# Altium PCB DC-Motor-Driver-v1.0.PcbDoc (part 3 of 5)
Units mil, origin at the board's own origin, x right, y up, seen from the top; angles counter-clockwise.
Board outline 1968.5 x 1574.8 mil, 4 copper layers (Top Layer, Signal 1, Signal 2, Bottom Layer), stack 62.055 mil thick; 133 components, 124 nets, 619 pads, 342 vias.
Unrouted connection lines stored in the file: 5.
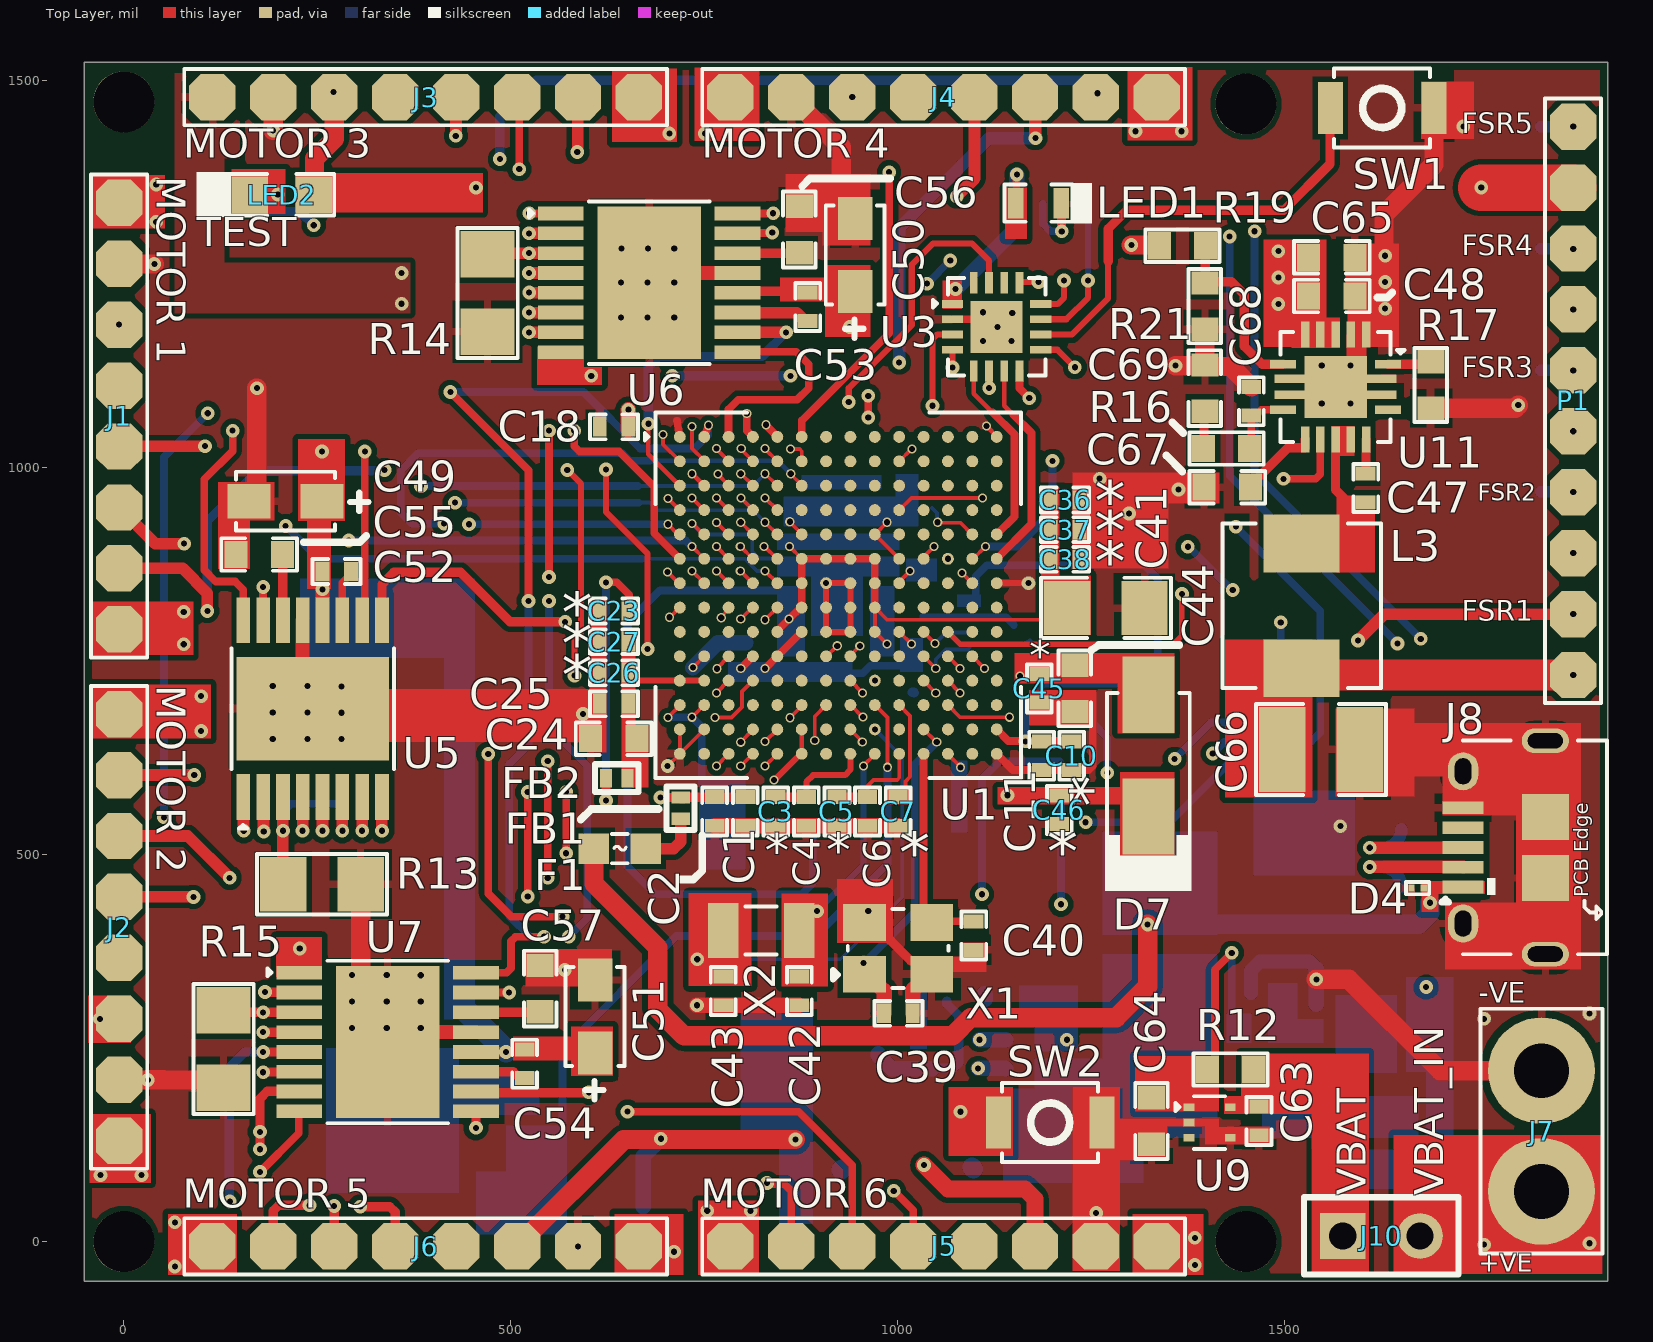
[diagram p0: Top Layer view]

## Via types
v1: diameter 17.72, hole 7.87, Top Layer to Bottom Layer, tented both sides, 254 vias
v2: diameter 11.81, hole 7.87, Top Layer to Bottom Layer, tented both sides, 88 vias

## Nets (pads, with @x,y where several pads share a name; then routed paths per layer and width w, separated by ;. In a path a pad name is that pad's centre, name@x,y a point inside that pad or via, vN(x,y) a via of type N, cw(c..) or ccw(c..) an arc to the next point about the centre after c; other vN are vias at no path point) (continued)
ENABLE_5_6: (continued)
  Top Layer w5: v2(734.29,961.12) U1.D2@750.04,945.47
  Top Layer w10: v1(471,630.14) 471,450 501,420 v1(567,420)
  Top Layer w15: 226.65,369.65 226.65,378.14 v1(227.37,378.86)
  Signal 1 w5: 685.87,976.97 718.44,976.97 v2(734.29,961.12)
  Signal 1 w10: v1(471,630.14) 471,847 600.97,976.97 685.87,976.97
  Signal 2 w15: v1(227.37,378.86) 268.51,420 v1(567,420)
FAULT_1_2: U1.F4 U5.8 | length 816.2
  Top Layer w5: v2(796.69,898.23) 796.98,898.23 812.73,882.48 U1.F4@813.03,882.48
  Top Layer w15: v1(333.57,531) U5.8@333.57,574.65
  Signal 2 w5: 722,882.48 781.54,882.48 796.69,897.63 v2(796.69,898.23)
  Signal 2 w10: v1(333.57,531) 333.57,695.57 566,928 662,928 707.52,882.48 722,882.48
FAULT_3_4: U1.B6 U6.8 | length 383.2
  Top Layer w5: v2(861.54,1024.41) 873.09,1024.41 876.02,1021.48 U1.B6@876.02,1008.46
  Signal 1 w12: v1(604,1118.86) v1(708.72,1118.86) ; v2(861.54,1024.41) v1(861.54,1118.86)
  Bottom Layer w12: v1(708.72,1118.86) v1@862.54,1118.86 ; v1@861,1116.72 v1@862.54,1116.72
FAULT_5_6: U1.B3 U7.8 | length 1537
  Top Layer w5: v2(765.79,1024.89) 765.79,1024.55 781.54,1008.8 U1.B3@781.54,1008.46
  Top Layer w10: v1(176,90) 226.09,140.09 U7.8@226.09,169
  Top Layer w12: U7.8@226.09,169 U7.8@226.65,168.43
  Signal 1 w10: v1(176,90) 196.62,90 202.48,95.86 202.48,314.28 362,473.8 362,1000.5 386.39,1024.89 v2(765.79,1024.89)
FB: R19.1 R21.2 U11.7 | length 232.6
  Top Layer w12: R19.1@1397.5,1288.5 1397.5,1240.5 1431.5,1240.5 1448,1224 1448,1157 1471,1134 U11.7@1498,1134
  Top Layer w25: R19.1@1397,1289 R19.1@1397.5,1288.5
FSR1: P1.2 R7.2 U1.L11 | length 961.8
  Top Layer w5: U1.L11@1033.5,725 v2(1049.25,709.25)
  Top Layer w15: v1(1595,777) 1629,811 1872.92,811 v1(1873,810.92)
  Signal 1 w15: v2(1049.25,709.25) 1073.5,685 1108,685 1129,706 1355,706 1426,777 v1(1595,777)
  Bottom Layer w15: R7.2@1819.5,810.92 v1(1873,810.92)
FSR2: P1.4 R6.2 U1.M12 | length 977
  Top Layer w5: U1.M12@1065,693.5 1080.75,677.76 v2(1144.58,677.76)
  Signal 2 w15: v2(1144.58,677.76) 1334.76,677.76 1625.92,968.92 v1(1873,968.92)
  Bottom Layer w15: 1831.08,968.92 v1(1873,968.92)
FSR3: P1.6 R5.2 U1.L12 | length 1029
  Top Layer w5: U1.L12@1065,725 v2(1080.75,709.25)
  Signal 2 w15: v2(1080.75,709.25) 1333.29,709.25 1749.95,1125.92 v1(1873,1125.92)
  Bottom Layer w15: 1831.08,1125.92 v1(1873,1125.92)
FSR4: P1.8 R4.2 U1.K12 | length 1163.7
  Top Layer w5: U1.K12@1065,756.5 v2(1080.75,740.75)
  Signal 1 w15: v2(1080.75,740.75) 1080.75,801.75 1177,898 v1(1375,898)
  Signal 2 w10: v1(1433,842) 1433,842.92 v1(1873,1282.92)
  Bottom Layer w10: v1(1375,898) 1376,898 1432,842 v1(1433,842)
  Bottom Layer w15: 1831.08,1282.92 v1(1873,1282.92)
FSR5: P1.10 R3.2 U1.J12 | length 1238.4
  Top Layer w7: U1.J12@1065,787.99 1080.99,772 1355.99,772 1367.36,783.37 v1(1367.36,837)
  Signal 2 w10: v1(1367.36,837) 1394.05,837 1873,1315.95 v1(1873,1440.92)
  Bottom Layer w10: 1831,1441 1831.08,1440.92
  Bottom Layer w15: 1831.08,1440.92 v1(1873,1440.92)